# Altium PCB OSP_Carrier_V8_ascii.PcbDoc (part 3 of 3)
Units mm, origin at the board's own origin, x right, y up, seen from the top; angles counter-clockwise.
Board outline 64.1 x 51.1 mm, 4 copper layers (Component Side, Signal Layer 1, Signal Layer 2, Solder Side), stack 1.58 mm thick; 182 components, 144 nets, 1232 pads, 422 vias.
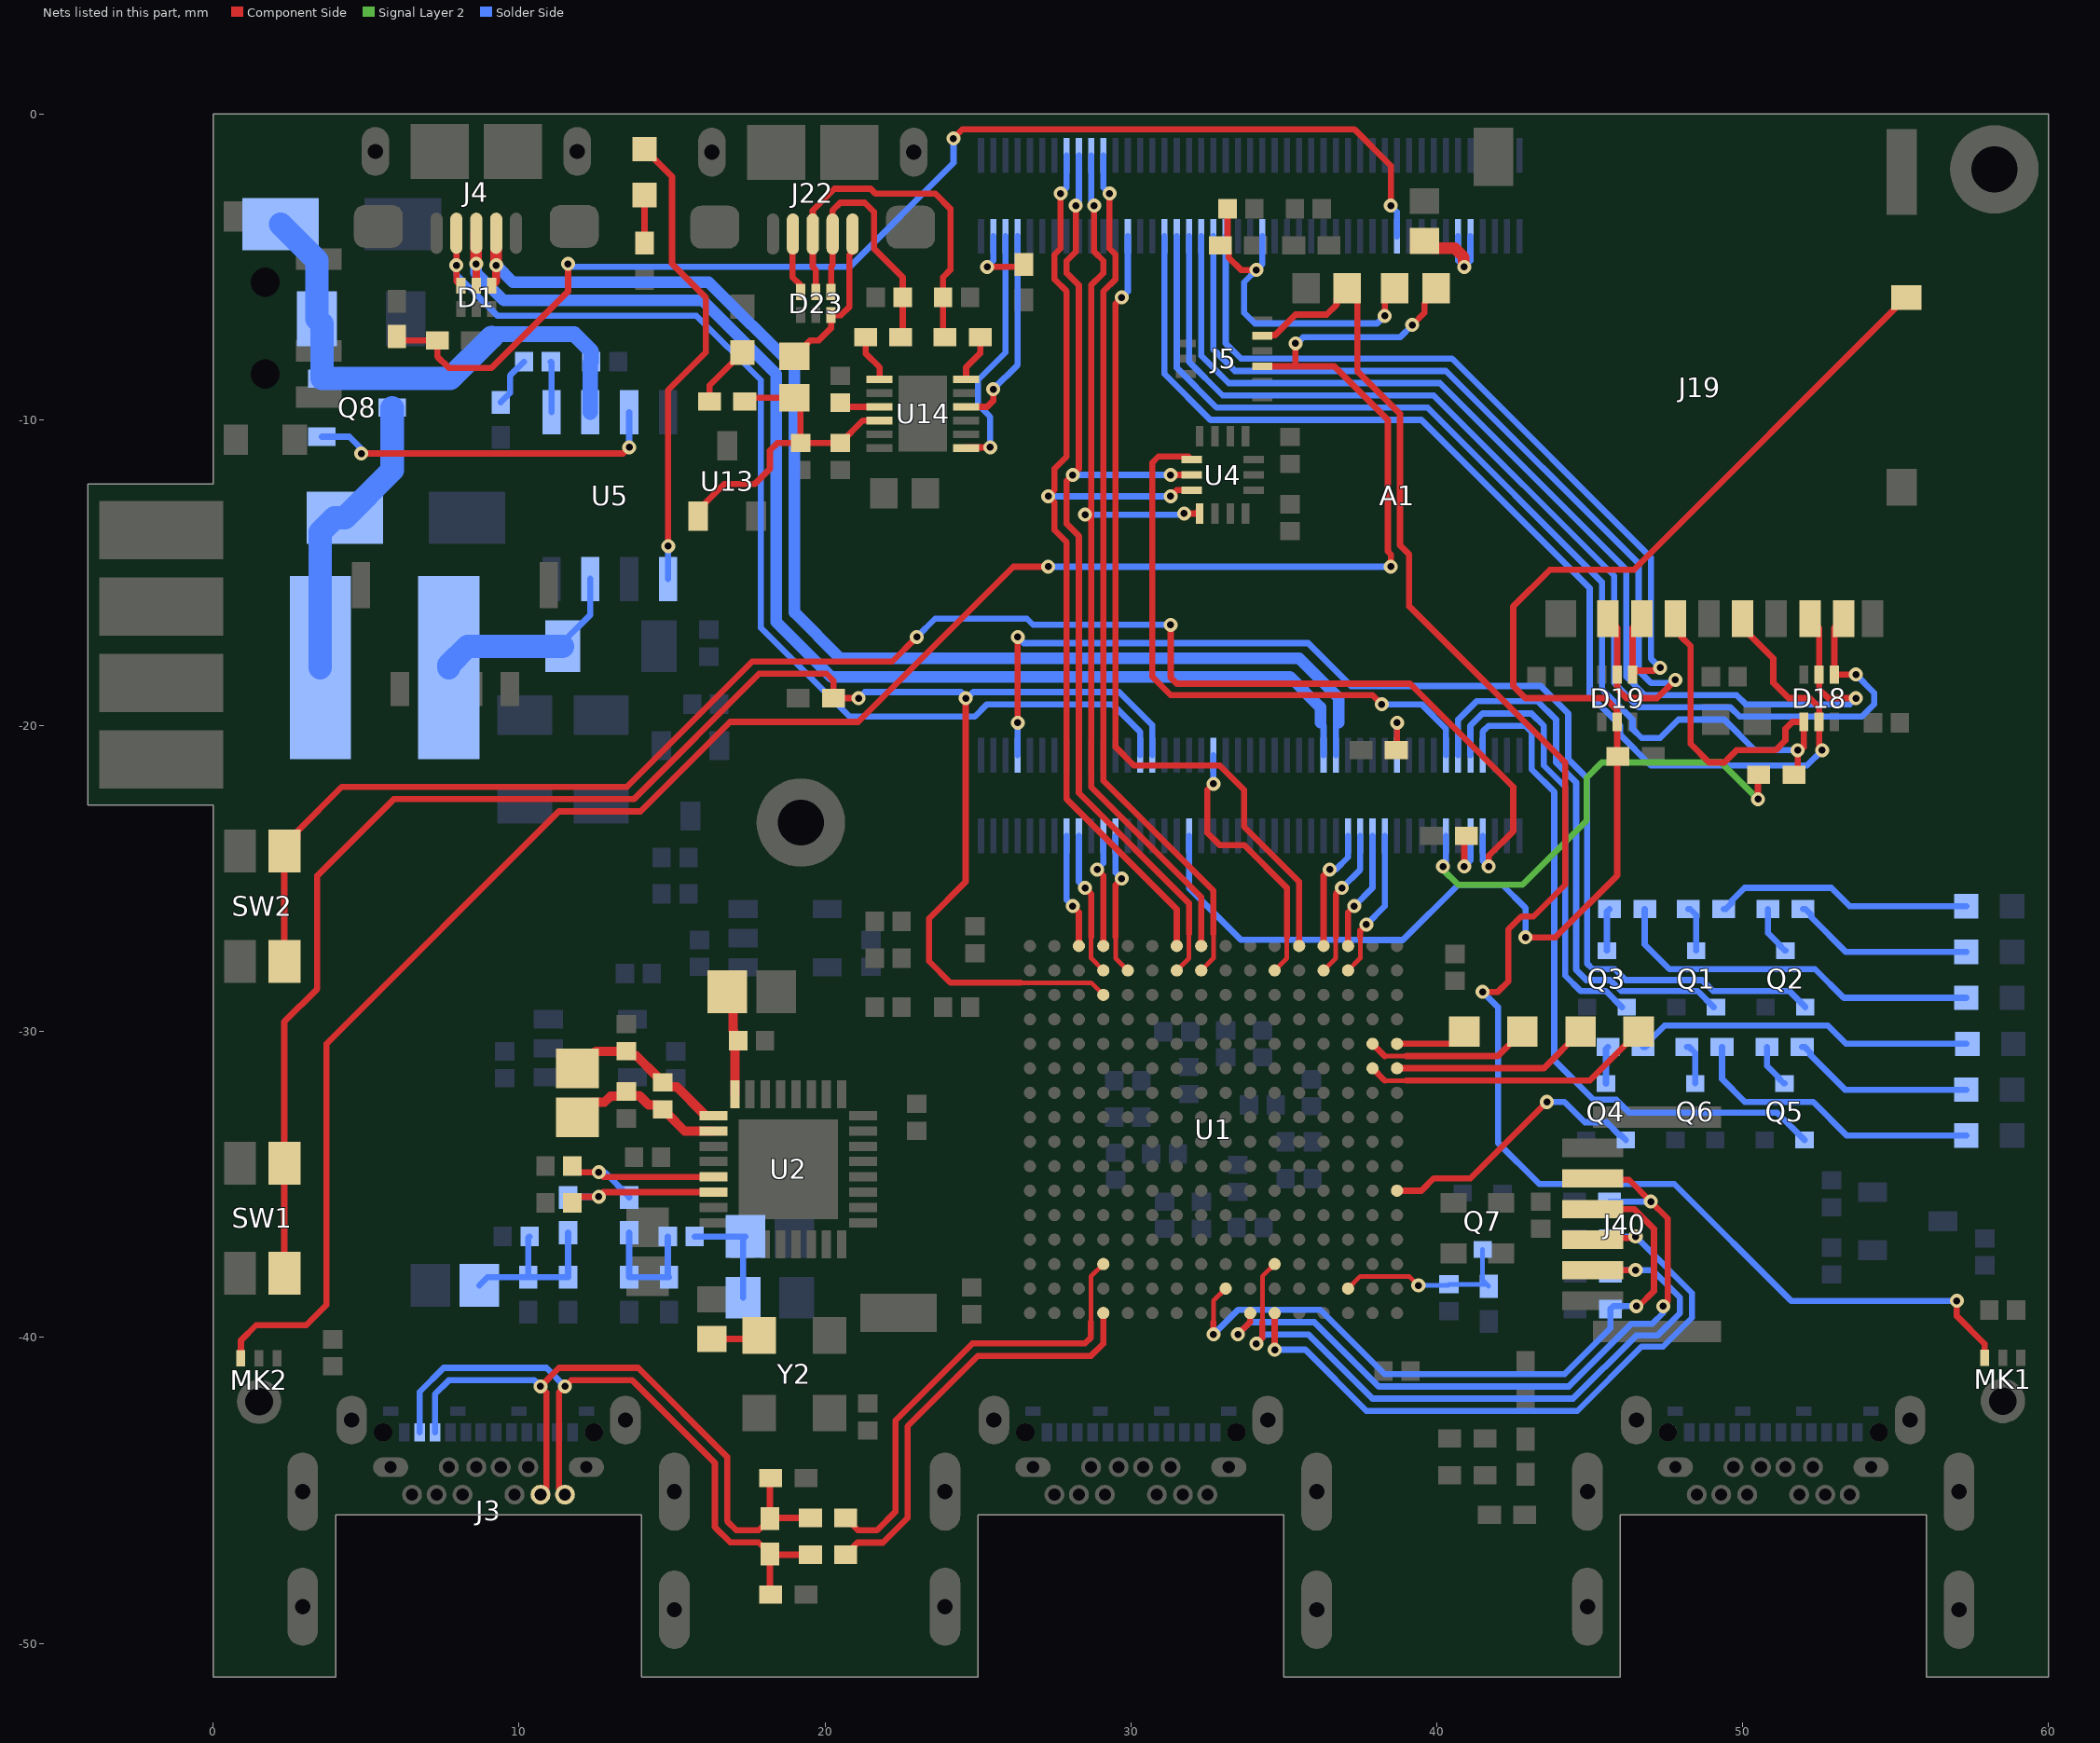
[diagram p4: the nets of this part, all layers, seen from the top]

## Via types
v1: diameter 0.457, hole 0.229, Component Side to Solder Side, tented both sides, 422 vias

## Nets (pads, with @x,y where several pads share a name; then routed paths per layer and width w, separated by ;. In a path a pad name is that pad's centre, name@x,y a point inside that pad or via, vN(x,y) a via of type N, cw(c..) or ccw(c..) an arc to the next point about the centre after c; other vN are vias at no path point) (continued)
MICL_PRE: C98.2 J5.1 MK1.1 | length 55.5
  Component Side w0.203: J5.1@34.3,-7.25 34.323,-7.227 34.713,-7.227 35.38,-6.56 36.4,-6.56 36.727,-6.233 36.727,-6.048 C98.2@37.075,-5.7 ; C98.2@37.4,-5.7 37.4,-8.4 38.8,-9.8 38.8,-14.1 39.1,-14.4 39.1,-16.1 44.2,-21.2 44.2,-25.2 43.165,-26.235 42.765,-26.235 42.34,-26.66 42.34,-28.36 42,-28.7 v1(41.5,-28.7) ; v1(57,-38.8) 57,-39.3 57.912,-40.212 MK1.1@57.912,-40.665
  Solder Side w0.203: v1(41.5,-28.7) 42.001,-29.201 42.001,-33.632 43.35,-34.981 47.763,-34.981 51.584,-38.802 56.998,-38.802 v1(57,-38.8)
MICR: A1.43 C47.2 C99.1 R40.1 | length 11.5
  Component Side w0.203: R40.1@32.925,-4.3 R40.1@32.962,-4.3 ; C47.2@33.16,-3.1 33.16,-4.102 R40.1@32.962,-4.3 ; v1(34.1,-5.1) 33.6,-5.1 33.198,-4.698 33.198,-4.498 33,-4.3 R40.1@32.962,-4.3 ; v1(38.3,-6.6) 38.3,-6.025 C99.1@38.625,-5.7
  Solder Side w0.203: A1.43@34.3,-4 34.3,-4.9 v1(34.1,-5.1) 33.7,-5.5 33.7,-6.5 34.05,-6.85 38.05,-6.85 v1(38.3,-6.6)
MICR_PRE: C99.2 J5.5 MK2.1 | length 69.8
  Component Side w0.203: MK2.1@0.905,-40.685 0.905,-40.095 1.4,-39.6 3.04,-39.6 3.7,-38.94 3.7,-30.4 11.3,-22.8 13.971,-22.8 16.896,-19.875 21.085,-19.875 26.16,-14.8 v1(27.3,-14.8) ; J5.5@34.3,-8.25 35.4,-8.25 ; v1(35.38,-7.5) 35.38,-8.23 35.4,-8.25 ; v1(38.5,-14.8) 38.5,-14.4 38.4,-14.3 38.4,-10 36.65,-8.25 35.4,-8.25 ; v1(39.2,-6.9) 39.6,-6.5 39.6,-6.2 39.627,-6.173 39.627,-6.098 40.025,-5.7 C99.2@40.1,-5.7
  Solder Side w0.203: v1(27.3,-14.8) v1(38.5,-14.8) ; v1(35.38,-7.5) 35.426,-7.5 35.626,-7.3 38.8,-7.3 v1(39.2,-6.9)
MUTE_LED: Q4.1 U1.F1 | length 9.2
  Component Side w0.203: U1.F1@38.7,-35.2 39.5,-35.2 39.9,-34.8 41.1,-34.8 v1(43.6,-32.3)
  Solder Side w0.203: v1(43.6,-32.3) 44.173,-32.3 44.838,-32.965 45.554,-32.965 45.961,-33.373 46.008,-33.373 Q4.1@46.182,-33.546
NetA1_9: A1.9 A1.11 R6.1 | length 4
  Component Side w0.381: R6.1@39.7,-4.1 39.7,-4.2 39.884,-4.385 40.585,-4.385 40.885,-4.685 40.885,-4.985 v1(40.9,-5)
  Solder Side w0.203: A1.11@40.7,-4 40.7,-4.8 v1(40.9,-5) 41.1,-4.8 A1.9@41.1,-4
NetA1_21: A1.21 R30.1 R35.2 | length 40.4
  Component Side w0.203: R35.2@6,-7.275 6.125,-7.4 R30.1@7.325,-7.4 7.325,-7.925 7.7,-8.3 9.1,-8.3 11.6,-5.8 v1(11.6,-4.9) ; v1(24.2,-0.8) 24.5,-0.5 37.3,-0.5 38.5,-1.7 v1(38.5,-3)
  Solder Side w0.203: v1(11.6,-4.9) 11.7,-5 20.8,-5 24.2,-1.6 v1(24.2,-0.8) ; v1(38.5,-3) 38.7,-3.2 A1.21@38.7,-4
NetA1_49: A1.49 D19.4 J19.2 | length 27
  Component Side w0.203: J19.2@46.7,-16.5 46.4,-16.8 D19.4@46.4,-18.325 46.525,-18.2 47.1,-18.2 47.2,-18.1 v1(47.3,-18.1)
  Solder Side w0.203: A1.49@33.1,-4 33.1,-7.5 33.6,-8 40.5,-8 47,-14.5 47,-17.8 v1(47.3,-18.1)
NetA1_51: A1.51 D19.5 J19.1 | length 30.1
  Component Side w0.203: J19.1@45.6,-16.5 45.9,-16.8 D19.5@45.9,-18.325 45.9,-18.8 46.2,-19.1 47.2,-19.1 v1(47.8,-18.5)
  Solder Side w0.203: A1.51@32.7,-4 32.7,-7.7 33.4,-8.4 40.3,-8.4 46.6,-14.7 46.6,-18.2 47,-18.6 47.7,-18.6 v1(47.8,-18.5)
NetA1_53: A1.53 D18.2 J19.7 | length 35.9
  Component Side w0.203: J19.7@52.2,-16.5 52.5,-16.8 D18.2@52.5,-18.325 52.5,-18.8 52.8,-19.1 v1(53.7,-19.1)
  Solder Side w0.203: A1.53@32.3,-4 32.3,-7.9 33.2,-8.8 40.1,-8.8 46.2,-14.9 46.2,-18.4 46.8,-19 49.8,-19 50.1,-19.3 53.5,-19.3 v1(53.7,-19.1)
NetA1_55: A1.55 D18.1 J19.8 | length 37.4
  Component Side w0.203: J19.8@53.3,-16.5 53,-16.8 D18.1@53,-18.325 v1(53.7,-18.325)
  Solder Side w0.203: A1.55@31.9,-4 31.9,-8.1 33,-9.2 39.9,-9.2 45.8,-15.1 45.8,-18.6 46.6,-19.4 49.6,-19.4 49.9,-19.7 53.9,-19.7 54.3,-19.3 54.3,-18.925 v1(53.7,-18.325)
NetA1_57: A1.57 D18.4 J19.3 R32.1 | length 43.4
  Component Side w0.203: J19.3@47.8,-16.5 48,-16.7 48,-17.1 48.3,-17.4 48.3,-20.6 48.9,-21.2 49.4,-21.2 49.8,-20.8 51.075,-20.8 51.4,-20.475 51.4,-20.1 51.625,-19.875 D18.4@52,-19.875 52,-20.7 51.9,-20.8 v1(51.8,-20.8) 51.8,-21.475 R32.1@51.675,-21.6
  Solder Side w0.203: A1.57@31.5,-4 31.5,-8.3 32.8,-9.6 39.7,-9.6 45.4,-15.3 45.4,-18.8 46.4,-19.8 46.4,-20.1 46.7,-20.4 47.3,-20.4 47.9,-19.8 49.4,-19.8 50.4,-20.8 v1(51.8,-20.8)
NetA1_59: A1.59 D18.5 J19.5 | length 39.5
  Component Side w0.203: J19.5@50,-16.5 50.2,-16.7 50.2,-17 51,-17.8 51,-18.6 51.5,-19.1 52.2,-19.1 52.5,-19.4 D18.5@52.5,-19.875 52.5,-20.7 v1(52.6,-20.8)
  Solder Side w0.203: A1.59@31.1,-4 31.1,-8.5 32.6,-10 39.5,-10 45,-15.5 45,-19 46,-20 46,-20.3 47,-21.3 52.1,-21.3 v1(52.6,-20.8)
NetA1_83: A1.83 U14.10 | length 6.7
  Component Side w0.203: U14.10@24.615,-9.575 25.3,-9.575 25.5,-9.375 v1(25.5,-9)
  Solder Side w0.203: v1(25.5,-9) 26.3,-8.2 A1.83@26.3,-4
NetA1_85: A1.85 U14.7 | length 8.3
  Component Side w0.203: U14.7@24.6,-10.94 U14.7@24.615,-10.925 24.64,-10.9 v1(25.4,-10.9)
  Solder Side w0.203: v1(25.4,-10.9) 25.4,-9.9 25,-9.5 25,-8.7 25.9,-7.8 A1.85@25.9,-4
NetA1_87: A1.87 R28.1 | length 2.3
  Component Side w0.203: v1(25.3,-5) 26.425,-5 R28.1@26.5,-4.925
  Solder Side w0.203: v1(25.3,-5) 25.5,-4.8 A1.87@25.5,-4
NetA1_113: A1.113 R32.2 | length 15.4
  Component Side w0.203: v1(50.5,-22.4) 50.5,-21.625 R32.2@50.525,-21.6
  Signal Layer 2 w0.203: v1(40.2,-24.6) 40.2,-24.7 40.7,-25.2 42.8,-25.2 44.9,-23.1 44.9,-21.7 45.4,-21.2 49.3,-21.2 v1(50.5,-22.4)
  Solder Side w0.203: v1(40.2,-24.6) 40.3,-24.5 A1.113@40.3,-23.6
NetA1_122: A1.122 R31.1 | length 2
  Component Side w0.203: R31.1@38.675,-20.8 38.7,-20.775 v1(38.7,-19.9)
  Solder Side w0.203: A1.122@38.7,-20.96 v1(38.7,-19.9)
NetA1_155: A1.155 D19.2 J19.10 R47.1 | length 48
  Component Side w0.203: v1(42.9,-26.919) 43.881,-26.919 45.9,-24.9 D19.2@45.9,-19.875 45.9,-19.5 45.5,-19.1 42.9,-19.1 42.5,-18.7 42.5,-16.1 43.7,-14.9 46.45,-14.9 J19.10@55.35,-6
  Solder Side w0.203: A1.155@31.9,-23.6 31.9,-25.3 33.6,-27 37.482,-27 37.49,-27.008 38.892,-27.008 40.7,-25.2 42.142,-25.2 42.9,-25.958 v1(42.9,-26.919)
NetA1_164: A1.164 D1.3 J4.4 | length 36.5
  Component Side w0.203: J4.4@7.95,-3.9 v1(7.95,-4.95) 7.95,-5.47 D1.3@8.1,-5.62
  Solder Side w0.203: v1(7.95,-4.95) 7.95,-5.25 9.3,-6.6 15.8,-6.6 17.9,-8.7 17.9,-16.8 20.8,-19.7 24.9,-19.7 25.3,-19.3 29.4,-19.3 30.3,-20.2 A1.164@30.3,-20.96
NetC14_1: C14.1 Q7.2 R3.1 U1.B3 | length 6.1
  Component Side w0.152: U1.B3@37.1,-38.4 37.5,-38 39.1,-38 v1(39.4,-38.3)
  Solder Side w0.152: v1(39.4,-38.3) 40.36,-38.3 C14.1@40.4,-38.26 R3.1@41.635,-38.26 ; Q7.2@41.5,-37.125 41.5,-38.125 R3.1@41.635,-38.26 ; R3.1@41.7,-38.325 R3.1@41.635,-38.26
NetC29_1: C29.1 C107.2 R78.2 | length 3.7
  Solder Side w0.203: C29.1@15.74,-36.7 C107.2@17.4,-36.7 17.325,-36.775 R78.2@17.325,-38.7
NetC29_2: C29.2 R33.1 R36.1 R37.2 | length 4.1
  Solder Side w0.203: R36.1@13.6,-36.575 R33.1@13.6,-38.025 R37.2@14.9,-38.025 14.86,-37.985 C29.2@14.86,-36.7
NetC30_2: C30.2 R36.2 U2.29 | length 6.1
  Component Side w0.203: C30.2@11.74,-34.4 11.94,-34.6 v1(12.6,-34.6) 12.75,-34.75 U2.29@16.349,-34.75
  Solder Side w0.203: v1(12.6,-34.6) 12.8,-34.6 13.6,-35.4 R36.2@13.6,-35.425
NetC31_2: C31.2 C32.1 U2.24 | length 4
  Component Side w0.203: C32.1@17.05,-30.41 C32.1@17.16,-30.3
  Component Side w0.305: C31.2@16.5,-29 C31.2@16.8,-28.7 17,-28.9 17,-29.954 17.012,-29.966 17.012,-30.152 C32.1@17.16,-30.3 ; U2.24@17.05,-32.049 C32.1@17.05,-30.41
NetC33_1: C33.1 C34.2 C35.1 U2.25 | length 5.6
  Component Side w0.305: C34.2@11.9,-31.2 11.95,-31.2 12.51,-30.64 C33.1@13.5,-30.64 13.648,-30.788 13.828,-30.788 14.532,-31.492 14.532,-31.512 14.68,-31.66 C35.1@14.7,-31.66 14.848,-31.808 15.159,-31.808 16.044,-32.693 16.044,-32.75 U2.25@16.349,-32.75
NetC34_1: C34.1 C35.2 C36.1 U2.26 | length 5.3
  Component Side w0.305: C34.1@11.9,-32.8 12.393,-32.307 12.793,-32.307 12.992,-32.108 13.352,-32.108 C36.1@13.5,-31.96 13.64,-32.1 13.94,-32.1 14.232,-32.392 14.552,-32.392 C35.2@14.7,-32.54 14.72,-32.54 14.868,-32.688 14.868,-32.708 15.41,-33.25 U2.26@16.349,-33.25
NetC37_2: C37.2 C38.1 R38.1 R39.1 R42.2 | length 5.8
  Solder Side w0.203: C37.2@8.7,-38.3 8.975,-38.025 R42.2@10.3,-38.025 ; C38.1@10.34,-36.7 10.3,-36.74 R42.2@10.3,-38.025 ; R39.1@11.6,-36.575 R38.1@11.6,-38.025 R42.2@10.3,-38.025
NetC40_2: C40.2 R39.2 U2.30 | length 5.8
  Component Side w0.203: C40.2@11.74,-35.6 11.94,-35.4 v1(12.6,-35.4) 12.75,-35.25 U2.30@16.349,-35.25
  Solder Side w0.203: R39.2@11.6,-35.425 11.625,-35.4 v1(12.6,-35.4)
NetC46_1: C46.1 C53.1 D2.2 Q8.2 U5.2 | length 17.3
  Solder Side w0.508: 9.1,-7.3 9.2,-7.2 11.8,-7.2 12.36,-7.76 C53.1@12.36,-8.1 12.33,-8.13 U5.2@12.33,-9.75
  Solder Side w0.762: D2.2@2.2,-3.6 3.39,-4.79 C46.1@3.39,-6.7 3.55,-6.86 Q8.2@3.55,-8.65 7.75,-8.65 9.1,-7.3
NetC49_1: C49.1 U5.1 | length 1.7
  Solder Side w0.203: C49.1@11.04,-8.1 11.06,-8.12 U5.1@11.06,-9.75
NetC49_2: C49.2 R9.1 | length 1.6
  Solder Side w0.203: R9.1@9.4,-9.425 9.7,-9.125 9.7,-8.56 C49.2@10.16,-8.1
NetC71_2: C71.2 C72.2 FB3.1 R49.1 U13.1 U14.4 | length 10.9
  Component Side w0.203: U13.1@15.85,-13.15 15.85,-12.95 16.7,-12.1 17.7,-12.1 18.2,-11.6 18.2,-11 18.44,-10.76 C71.2@19.2,-10.76 ; R49.1@17.375,-9.4 17.5,-9.275 FB3.1@19,-9.275 19.2,-9.475 C71.2@19.2,-10.76 ; U14.4@21.785,-10.025 21.235,-10.025 C72.2@20.5,-10.76 C71.2@19.2,-10.76
NetC73_2: C73.2 U14.3 | length 1.3
  Component Side w0.203: C73.2@20.5,-9.44 20.635,-9.575 U14.3@21.785,-9.575
NetD3_2: D3.2 L1.2 Q8.3 | length 9.7
  Solder Side w0.762: L1.2@3.5,-18.1 3.5,-13.669 3.969,-13.2 D3.2@4.3,-13.2 5.85,-11.65 Q8.3@5.85,-9.6
NetD23_3: D23.3 J22.4 | length 2.1
  Component Side w0.203: J22.4@18.95,-3.925 18.934,-3.941 18.934,-5.334 19.2,-5.6 D23.3@19.2,-5.82 D23.3@19.2,-5.92
NetD23_6: D23.6 FB3.2 J22.1 | length 5.2
  Component Side w0.203: FB3.2@19,-7.925 19.525,-7.4 19.8,-7.4 20.2,-7 D23.6@20.2,-6.58 20.52,-6.58 20.8,-6.3 20.8,-4.6 20.9,-4.5 J22.1@20.9,-3.925 J22.1@20.966,-3.991
NetJ40_2: J40.2 R4.1 U1.C6 | length 23.4
  Component Side w0.152: 34.3,-39.5 34.3,-38 U1.C6@34.7,-37.6
  Component Side w0.203: v1(34.1,-40.2) 34.3,-40 34.3,-39.5 ; J40.2@45.1,-37.8 45.102,-37.798 v1(46.5,-37.798)
  Solder Side w0.203: v1(34.1,-40.2) 34.4,-39.9 35.8,-39.9 37.9,-42 44.455,-42 46.518,-39.938 47.214,-39.938 47.95,-39.202 47.95,-38.7 47.047,-37.798 v1(46.5,-37.798) 45.777,-37.798 R4.1@45.675,-37.9
NetJ40_3: J40.3 R7.1 U1.A6 | length 22.6
  Component Side w0.203: v1(34.7,-40.4) U1.A6@34.7,-39.2 ; J40.3@45.1,-36.8 45.151,-36.749 46.451,-36.749 v1(46.5,-36.7)
  Solder Side w0.203: v1(34.7,-40.4) 35.7,-40.4 37.7,-42.4 44.594,-42.4 46.694,-40.3 47.4,-40.3 48.345,-39.355 48.345,-38.545 v1(46.5,-36.7) 45.735,-36.7 R7.1@45.675,-36.76
NetJ40_4: J40.4 R10.1 U1.B8 | length 23.1
  Component Side w0.152: 32.7,-39.5 32.7,-38.8 U1.B8@33.1,-38.4
  Component Side w0.203: v1(32.7,-39.9) 32.7,-39.5 ; J40.4@45.1,-35.8 46.451,-35.8 47.1,-36.449 47.1,-38.482 46.607,-38.975 v1(46.525,-38.975)
  Solder Side w0.203: v1(32.7,-39.9) 33.5,-39.1 36.2,-39.1 38.3,-41.2 44.178,-41.2 45.675,-39.703 R10.1@45.675,-39.075 45.775,-38.975 v1(46.525,-38.975)
NetJ40_5: J40.5 R11.2 U1.A7 | length 24.5
  Component Side w0.203: v1(33.5,-39.9) 33.9,-39.5 U1.A7@33.9,-39.2 ; J40.5@45.1,-34.8 45.146,-34.846 46.286,-34.846 v1(47,-35.56) 47.55,-36.11 47.55,-38.825 v1(47.4,-38.975)
  Solder Side w0.203: v1(33.5,-39.9) 33.9,-39.5 36,-39.5 38.1,-41.6 44.317,-41.6 46.367,-39.55 47.05,-39.55 47.4,-39.2 v1(47.4,-38.975) ; R11.2@45.774,-35.684 R11.2@45.65,-35.56 v1(47,-35.56)
NetL1_1: L1.1 R8.2 U5.7 | length 6.6
  Solder Side w0.203: R8.2@11.425,-17.4 11.425,-17.275 12.33,-16.37 U5.7@12.33,-15.2
  Solder Side w0.762: L1.1@7.7,-18.1 7.7,-18.019 8.319,-17.4 R8.2@11.425,-17.4
NetLD1_1: LD1.1 R1.1 | length 1.6
  Component Side w0.203: R1.1@14.1,-4.25 R1.1@14.1,-4.225 LD1.1@14.1,-2.65
NetLD1_2: LD1.2 U5.5 | length 15.4
  Component Side w0.203: LD1.2@14.1,-1.15 15,-2.05 15,-4.9 16.1,-6 16.1,-7.8 14.87,-9.03 v1(14.87,-14.13)
  Solder Side w0.203: U5.5@14.87,-15.2 v1(14.87,-14.13)
NetLD5_2: LD5.2 R22.2 | length 8.5
  Solder Side w0.203: R22.2@49.375,-25.992 49.45,-25.992 49.648,-25.794 49.648,-25.719 50.067,-25.3 52.9,-25.3 53.5,-25.9 LD5.2@57.31,-25.9
NetLD6_2: LD6.2 R23.2 | length 6
  Solder Side w0.203: R23.2@51.975,-25.992 52.05,-25.992 52.248,-26.19 52.248,-26.265 53.38,-27.397 LD6.2@57.31,-27.397
NetLD7_2: LD7.2 R24.2 | length 12.4
  Solder Side w0.203: R24.2@46.799,-25.992 46.799,-27.149 47.609,-27.959 52.368,-27.959 53.306,-28.897 LD7.2@57.31,-28.897
NetLD8_2: LD8.2 R25.2 | length 11.1
  Solder Side w0.203: R25.2@46.75,-30.5 46.825,-30.5 47.023,-30.302 47.023,-30.227 47.45,-29.8 52.783,-29.8 53.38,-30.397 LD8.2@57.31,-30.397
NetLD9_2: LD9.2 R26.2 | length 6
  Solder Side w0.203: R26.2@51.946,-30.5 52.021,-30.5 52.219,-30.698 52.219,-30.773 53.346,-31.9 LD9.2@57.31,-31.9
NetLD10_2: LD10.2 R27.2 | length 9.8
  Solder Side w0.203: R27.2@49.325,-30.5 49.325,-31.55 50.075,-32.3 52.309,-32.3 53.409,-33.4 LD10.2@57.31,-33.4
NetLD11_1: LD11.1 R49.2 | length 2
  Component Side w0.203: R49.2@16.225,-9.4 16.225,-8.875 LD11.1@17.3,-7.8
NetQ1_2: Q1.2 R22.1 | length 1.5
  Solder Side w0.203: R22.1@48.225,-25.992 48.282,-25.992 48.48,-26.19 Q1.2@48.48,-27.35
NetQ2_2: Q2.2 R23.1 | length 1.6
  Solder Side w0.203: R23.1@50.825,-25.992 50.825,-26.775 51.202,-27.151 51.202,-27.176 51.375,-27.35 Q2.2@51.4,-27.35
NetQ3_2: Q3.2 R24.1 | length 1.4
  Solder Side w0.203: Q3.2@45.561,-27.35 45.561,-26.08 R24.1@45.649,-25.992
NetQ4_2: Q4.2 R25.1 | length 1.2
  Solder Side w0.203: Q4.2@45.532,-31.696 45.532,-30.568 R25.1@45.6,-30.5
NetQ5_2: Q5.2 R26.1 | length 1.4
  Solder Side w0.203: R26.1@50.796,-30.5 50.796,-31.117 51.172,-31.494 51.172,-31.519 51.346,-31.692 Q5.2@51.371,-31.692
NetQ6_2: Q6.2 R27.1 | length 1.4
  Solder Side w0.203: R27.1@48.175,-30.5 48.25,-30.5 48.448,-30.698 48.448,-30.815 48.451,-30.817 Q6.2@48.451,-31.692
NetQ8_1: Q8.1 U5.3 | length 11.6
  Component Side w0.203: v1(4.84,-11.1) 13.4,-11.1 v1(13.6,-10.9)
  Solder Side w0.203: Q8.1@3.55,-10.55 4.45,-10.55 4.84,-10.94 v1(4.84,-11.1) ; v1(13.6,-10.9) U5.3@13.6,-9.75
NetR15_2: R15.2 Y2.3 | length 1.6
  Component Side w0.203: R15.2@16.3,-40.05 17.73,-40.05 Y2.3@17.85,-39.93
R_LVDS_N: J3.A10 J3.B10 R18.1 R19.2 R20.2 | length 22.7
  Component Side w0.203: J3.B10@10.7,-45.14 10.894,-44.946 10.894,-41.794 v1(10.7,-41.6) 11.306,-40.994 13.894,-40.994 16.8,-43.9 16.8,-46 17.1,-46.3 17.825,-46.3 R20.2@18.2,-45.925 ; R18.1@18.225,-44.6 18.2,-44.625 R20.2@18.2,-45.925 ; R19.2@19.525,-45.9 18.225,-45.9 R20.2@18.2,-45.925
  Solder Side w0.203: J3.A10@7.25,-43.1 7.25,-41.85 7.7,-41.4 10.5,-41.4 v1(10.7,-41.6)
R_LVDS_P: J3.A11 J3.B11 R20.1 R21.2 R29.2 | length 23.4
  Component Side w0.203: J3.B11@11.5,-45.14 11.3,-44.94 11.3,-41.8 v1(11.5,-41.6) 11.7,-41.4 13.7,-41.4 16.4,-44.1 16.4,-46.2 16.9,-46.7 17.825,-46.7 R20.1@18.2,-47.075 ; R29.2@18.225,-48.4 18.2,-48.375 R20.1@18.2,-47.075 ; R21.2@19.525,-47.1 18.225,-47.1 R20.1@18.2,-47.075
  Solder Side w0.203: J3.A11@6.75,-43.1 6.75,-41.775 7.532,-40.994 10.894,-40.994 v1(11.5,-41.6)
R_PRE_N: R19.1 U1.C13 | length 15.1
  Component Side w0.152: 28.694,-39.5 28.694,-38.006 U1.C13@29.1,-37.6
  Component Side w0.203: R19.1@20.675,-45.9 21.075,-46.3 21.7,-46.3 22.3,-45.7 22.3,-42.72 24.826,-40.194 28.5,-40.194 28.694,-40 28.694,-39.5
R_PRE_P: R21.1 U1.A13 | length 14
  Component Side w0.203: R21.1@20.675,-47.1 21.069,-46.706 21.894,-46.706 22.7,-45.9 22.7,-42.9 25,-40.6 28.7,-40.6 29.1,-40.2 U1.A13@29.1,-39.2
SPI1_CLK: A1.125 U1.T3 | length 3.9
  Component Side w0.203: U1.T3@37.1,-27.2 37.1,-26.1 v1(37.3,-25.9)
  Solder Side w0.203: v1(37.3,-25.9) 37.9,-25.3 A1.125@37.9,-23.6
SPI1_CS0: A1.129 U1.T4 | length 4
  Component Side w0.203: U1.T4@36.3,-27.2 36.3,-24.9 v1(36.5,-24.7)
  Solder Side w0.203: v1(36.5,-24.7) 36.7,-24.7 37.1,-24.3 A1.129@37.1,-23.6
SPI1_CS2: A1.65 U1.T5 | length 27.5
  Component Side w0.203: v1(29.7,-6) 29.5,-6.2 29.5,-20.7 30.1,-21.3 32.9,-21.3 33.7,-22.1 33.7,-23.3 35.5,-25.1 U1.T5@35.5,-27.2
  Solder Side w0.203: v1(29.7,-6) 29.9,-5.8 A1.65@29.9,-4
SPI1_MISO: A1.127 U1.R4 | length 4.9
  Component Side w0.152: U1.R4@36.3,-28 36.7,-27.6 36.7,-26.9
  Component Side w0.203: 36.7,-26.9 36.7,-25.5 v1(36.9,-25.3)
  Solder Side w0.203: v1(36.9,-25.3) 37.5,-24.7 A1.127@37.5,-23.6
SPI1_MOSI: A1.123 U1.R3 | length 4.9
  Component Side w0.152: U1.R3@37.1,-28 37.5,-27.6 37.5,-26.9
  Component Side w0.203: 37.5,-26.9 37.5,-26.7 v1(37.7,-26.5)
  Solder Side w0.203: v1(37.7,-26.5) 38.3,-25.9 A1.123@38.3,-23.6
SPI3_CLK: A1.74 U1.R10 U4.13 | length 32.8
  Component Side w0.152: U1.R10@31.5,-28 31.9,-27.6 31.9,-26.8
  Component Side w0.203: v1(28.2,-3) 28.2,-4.5 27.9,-4.8 27.9,-5.2 28.3,-5.6 28.3,-11.6 v1(28.1,-11.8) 27.9,-12 27.9,-13.4 28.3,-13.8 28.3,-22.2 31.9,-25.8 31.9,-26.8 ; v1(31.3,-11.8) U4.13@31.988,-11.8
  Solder Side w0.203: v1(28.1,-11.8) v1(31.3,-11.8) ; v1(28.2,-3) 28.3,-2.9 A1.74@28.3,-1.36
SPI3_CS0: A1.70 U1.R9 | length 28.6
  Component Side w0.152: U1.R9@32.3,-28 32.7,-27.6 32.7,-26.8
  Component Side w0.203: v1(29.3,-2.6) 29.3,-4.4 29.5,-4.6 29.5,-5.4 29.1,-5.8 29.1,-21.8 32.7,-25.4 32.7,-26.8
  Solder Side w0.203: A1.70@29.1,-1.36 29.1,-2.4 v1(29.3,-2.6)
SPI3_CS1: A1.114 U4.12 | length 19.7
  Component Side w0.203: 30.7,-11.44 30.7,-18.4 31.3,-19 37.9,-19 v1(38.2,-19.3) ; 30.7,-11.4 30.9,-11.2 31.888,-11.2 U4.12@31.988,-11.3 U4.12@31.8,-11.3
  Solder Side w0.203: v1(38.2,-19.3) 39.5,-19.3 40.3,-20.1 A1.114@40.3,-20.96
SPI3_CS3: A1.152 U1.R6 | length 8.8
  Component Side w0.152: U1.R6@34.7,-28 35.1,-27.6 35.1,-26.9
  Component Side w0.203: v1(32.7,-21.9) 32.5,-22.1 32.5,-23.5 32.9,-23.9 33.7,-23.9 35.1,-25.3 35.1,-26.9
  Solder Side w0.203: v1(32.7,-21.9) A1.152@32.7,-20.96
SPI3_MISO: A1.72 U1.T9 U4.1 | length 32.1
  Component Side w0.203: v1(28.8,-3) 28.8,-4.5 29.1,-4.8 29.1,-5.2 28.7,-5.6 28.7,-12.9 ; v1(31.738,-13.062) U4.1@32.25,-13.062 U4.1@32.188,-13 ; U1.T9@32.3,-27.2 32.3,-25.6 28.7,-22 28.7,-13.3 ; 28.7,-13.3 28.7,-12.9 ; 28.7,-13.3 v1(28.5,-13.1) 28.7,-12.9
  Solder Side w0.203: v1(28.5,-13.1) 31.7,-13.1 v1(31.738,-13.062) ; A1.72@28.7,-1.36 28.7,-2.9 v1(28.8,-3)
SPI3_MOSI: A1.76 U1.T10 U4.14 | length 32.9
  Component Side w0.203: v1(27.7,-2.6) 27.7,-4.4 27.5,-4.6 27.5,-5.4 27.9,-5.8 27.9,-11.2 27.5,-11.6 27.5,-12.3 v1(27.3,-12.5) 27.5,-12.7 27.5,-13.6 27.9,-14 27.9,-22.4 31.5,-26 U1.T10@31.5,-27.2 ; v1(31.3,-12.5) 31.5,-12.3 U4.14@31.988,-12.3
  Solder Side w0.203: v1(27.3,-12.5) v1(31.3,-12.5) ; v1(27.7,-2.6) 27.9,-2.4 A1.76@27.9,-1.36
SPI4_CLK: A1.167 U1.R12 | length 4.7
  Component Side w0.152: 29.5,-26.9 29.5,-27.6 U1.R12@29.9,-28
  Component Side w0.203: 29.5,-26.9 29.5,-25.2 v1(29.7,-25)
  Solder Side w0.203: A1.167@29.5,-23.6 29.5,-24.8 v1(29.7,-25)
SPI4_CS: A1.169 U1.T13 | length 3.8
  Component Side w0.203: v1(28.9,-24.7) 29.1,-24.9 U1.T13@29.1,-27.2
  Solder Side w0.203: v1(28.9,-24.7) 29.1,-24.5 A1.169@29.1,-23.6
SPI4_MISO: A1.175 U1.T14 | length 3.8
  Component Side w0.203: v1(28.1,-25.9) 28.3,-26.1 U1.T14@28.3,-27.2
  Solder Side w0.203: A1.175@27.9,-23.6 27.9,-25.7 v1(28.1,-25.9)
SPI4_MOSI: A1.173 U1.R13 | length 4.7
  Component Side w0.152: 28.7,-26.9 28.7,-27.6 U1.R13@29.1,-28
  Component Side w0.203: v1(28.5,-25.3) 28.7,-25.5 28.7,-26.9
  Solder Side w0.203: A1.173@28.3,-23.6 28.3,-25.1 v1(28.5,-25.3)
SW_PWR: A1.109 R34.2 | length 2.1
  Component Side w0.203: v1(40.9,-24.6) 40.9,-23.675 R34.2@40.975,-23.6
  Solder Side w0.203: v1(40.9,-24.6) 41.1,-24.4 A1.109@41.1,-23.6
SW_VOL+: A1.162 R44.1 SW1.1 U1.P13 | length 61.1
  Component Side w0.152: 26.4,-28.4 28.7,-28.4 U1.P13@29.1,-28.8
  Component Side w0.203: SW1.1@2.325,-37.9 SW1.1@2.325,-34.3 2.325,-29.675 3.4,-28.6 3.4,-24.9 5.9,-22.4 13.75,-22.4 17.85,-18.3 20.05,-18.3 20.275,-18.525 R44.1@20.275,-19.1 v1(21.1,-19.1) ; v1(24.6,-19.1) 24.6,-25.1 23.4,-26.3 23.4,-27.7 24.1,-28.4 26.4,-28.4
  Solder Side w0.203: v1(21.1,-19.1) 21.3,-18.9 24.446,-18.9 24.646,-19.1 24.846,-18.9 29.62,-18.9 30.7,-19.98 A1.162@30.7,-20.96
SW_VOL-: A1.107 SW2.1 | length 54.4
  Component Side w0.203: SW2.1@2.325,-27.7 SW2.1@2.325,-24.1 2.748,-23.677 2.748,-23.452 4.2,-22 13.52,-22 17.62,-17.9 22.2,-17.9 v1(23,-17.1) ; v1(31.3,-16.7) 31.3,-18.425 31.5,-18.625 39.125,-18.625 42.5,-22 42.5,-23.45 41.7,-24.25 v1(41.7,-24.6)
  Solder Side w0.203: v1(23,-17.1) 23.6,-16.5 26.6,-16.5 26.8,-16.7 v1(31.3,-16.7) ; A1.107@41.5,-23.6 41.5,-24.4 v1(41.7,-24.6)
TP_L1: TP1.1 U1.L1 | length 6.5
  Component Side w0.203: U1.L1@38.7,-31.2 38.704,-31.196 43.504,-31.196 TP1.1@44.7,-30
TP_L2: TP2.1 U1.L2 | length 9.5
  Component Side w0.152: 38.3,-31.6 39,-31.6
  Component Side w0.203: U1.L2@37.9,-31.2 38.3,-31.6 ; 39,-31.6 45,-31.6 TP2.1@46.6,-30
TP_M1: TP3.1 U1.M1 | length 2.4
  Component Side w0.203: U1.M1@38.7,-30.4 40.5,-30.4 TP3.1@40.9,-30
TP_M2: TP4.1 U1.M2 | length 5.4
  Component Side w0.152: 38.3,-30.8 39,-30.8
  Component Side w0.203: U1.M2@37.9,-30.4 38.3,-30.8 ; 39,-30.8 42,-30.8 TP4.1@42.8,-30
USB_D_N: A1.132 D1.1 J4.2 | length 41.8
  Component Side w0.254: D1.1@9.1,-5.62 9.25,-5.47 v1(9.25,-4.95)
  Component Side w0.381: v1(9.25,-4.95) J4.2@9.25,-3.9
  Solder Side w0.203: A1.132@36.7,-20.96 36.7,-20 36.8,-19.9
  Solder Side w0.381: v1(9.25,-4.95) 9.8,-5.5 16.2,-5.5 19,-8.3 19,-16.3 20.5,-17.8 35.5,-17.8 36.8,-19.1 36.8,-19.9
USB_D_P: A1.134 D1.2 J4.3 | length 41.8
  Component Side w0.254: D1.2@8.6,-5.62 v1(8.6,-4.9)
  Component Side w0.381: v1(8.6,-4.9) J4.3@8.6,-3.9
  Solder Side w0.203: 36.2,-19.9 36.3,-20 A1.134@36.3,-20.96
  Solder Side w0.381: v1(8.6,-4.9) 8.6,-5.2 9.5,-6.1 16,-6.1 18.4,-8.5 18.4,-16.6 20.2,-18.4 35.2,-18.4 36.2,-19.4 36.2,-19.9
USB_U_N: C74.2 D23.1 J22.2 R54.2 | length 8.9
  Component Side w0.203: D23.1@20.2,-5.92 D23.1@20.2,-5.82 20.2,-5 20.25,-4.95 J22.2@20.25,-3.925 20.25,-3.15 20.5,-2.9 21.3,-2.9 21.6,-3.2 21.6,-4.4 21.734,-4.534 ; 21.735,-4.534 22.066,-4.865 22.54,-5.34 C74.2@22.54,-6 22.54,-7.235 R54.2@22.475,-7.3
USB_U_P: C75.2 D23.2 J22.3 R55.2 | length 12.2
  Component Side w0.203: D23.2@19.7,-5.92 D23.2@19.7,-5.82 19.7,-5.1 19.6,-5 J22.3@19.6,-3.925 19.6,-3.153 20.311,-2.443 21.489,-2.443 21.647,-2.6 23.6,-2.6 24.1,-3.1 24.1,-5.1 23.86,-5.34 C75.2@23.86,-6 23.86,-7.235 R55.2@23.925,-7.3
USB_UX_N: R54.1 U14.1 | length 1.6
  Component Side w0.203: R54.1@21.325,-7.3 21.325,-7.825 21.785,-8.285 U14.1@21.785,-8.675
USB_UX_P: R55.1 U14.12 | length 1.6
  Component Side w0.203: U14.12@24.615,-8.675 24.615,-8.285 25.075,-7.825 R55.1@25.075,-7.3
USR_LED_1_CTRL: A1.112 Q1.1 | length 18.3
  Solder Side w0.203: A1.112@40.7,-20.96 40.7,-19.8 41.3,-19.2 43.3,-19.2 43.9,-19.8 43.9,-21.2 44.556,-21.856 44.556,-27.983 44.888,-28.315 45.672,-28.315 46.027,-28.671 48.524,-28.671 Q1.1@49.053,-29.2
USR_LED_2_CTRL: A1.184 Q2.1 | length 39.1
  Component Side w0.203: v1(26.3,-19.9) v1(26.3,-17.1)
  Solder Side w0.203: A1.184@26.3,-20.96 v1(26.3,-19.9) ; v1(26.3,-17.1) 26.5,-17.3 35.8,-17.3 37.2,-18.7 43.4,-18.7 44.3,-19.6 44.3,-21.092 44.911,-21.703 44.911,-27.771 45.1,-27.959 45.819,-27.959 46.175,-28.315 48.672,-28.315 49.027,-28.671 51.521,-28.671 Q2.1@52.05,-29.2
USR_LED_3_CTRL: A1.110 Q3.1 | length 14.4
  Solder Side w0.203: A1.110@41.1,-20.96 41.1,-20 41.5,-19.6 43.1,-19.6 43.5,-20 43.5,-21.3 44.2,-22 44.2,-28.172 44.699,-28.671 45.524,-28.671 Q3.1@46.053,-29.2
WAN_LED_CTRL: A1.108 Q5.1 | length 22.8
  Solder Side w0.203: A1.108@41.5,-20.96 41.5,-20.2 41.7,-20 42.9,-20 43.1,-20.2 43.1,-21.422 43.843,-22.165 43.843,-30.942 45.126,-32.225 45.866,-32.225 46.294,-32.653 51.131,-32.653 Q5.1@52.021,-33.542
pads on no net: A1.0 A1.12 A1.13 A1.14 A1.15 A1.16 A1.17 A1.18 A1.19 A1.20 A1.22 A1.23 A1.24 A1.25 A1.26 A1.28 A1.29 A1.30 A1.33 A1.34 A1.35 A1.36 A1.38 A1.40 A1.42 A1.44 A1.48 A1.50 A1.52 A1.54 A1.56 A1.58 A1.60 A1.62 A1.63 A1.64 A1.66 A1.67 A1.73 A1.75 A1.77 A1.80 A1.82 A1.84 A1.88 A1.89 A1.90 A1.104 A1.106 A1.116 A1.118 A1.119 A1.120 A1.124 A1.126 A1.128 A1.133 A1.135 A1.138 A1.139 A1.140 A1.141 A1.144 A1.145 A1.146 A1.148 A1.150 A1.153 A1.154 A1.157 A1.158 A1.168 A1.170 A1.171 A1.172 A1.174 A1.176 A1.178 A1.180 A1.181 A1.183 A1.186 A1.187 A1.188 D1.5 D19.1 D23.5 J0.1 J00.1 J00.2 J0.2 J0.3 J00.3 J00.4 J0.4 J0.5 J00.5 J0.6 J00.6 J0.7 J00.7 J0.8 J00.8 J0.9 J00.9 J0.10 J00.10 J00.11 J0.11 J00.12 J0.12 J0.13 J00.13 J00.14 J0.14 J00.15 J0.15 J00.16 J0.16 J00.17 J0.17 J00.18 J0.18 J0.19 J00.19 J0.20 J00.20 J00.21 J0.21 J0.22 J00.22 J0.23 J00.23 J00.24 J0.24 J00.25 J0.25 J0.26 J00.26 J00.27 J0.27 J00.28 J0.28 J0.29 J00.29 J0.30 J00.30 J0.31 J00.31 J00.32 J0.32 J00.33 J0.33 J00.34 J0.34 J00.35 J0.35 J00.36 J0.36 J0.37 J00.37 J0.38 J00.38 J0.39 J00.39 J00.40 J0.40 J0.41 J00.41 J0.42 J00.42 J0.43 J00.43 J0.44 J00.44 J0.45 J00.45 J0.46 J00.46 J0.47 J00.47 J00.48 J0.48 J00.49 J0.49 J0.50 J00.50 J00.51 J0.51 J0.52 J00.52 J0.53 J00.53 J00.54 J0.54 J0.55 J00.55 J0.56 J00.56 J0.57 J00.57 J0.58 J00.58 J00.59 J0.59 J0.60 J00.60 J00.61 J0.61 J00.62 J0.62 J00.63 J0.63 J00.64 J0.64 J0.65 J00.65 J00.66 J0.66 J0.67 J00.67 J0.68 J00.68 J0.69 J00.69 J0.70 J00.70 J0.71 J00.71 J0.72 J00.72 J0.73 J00.73 J00.74 J0.74 J0.75 J00.75 J0.76 J00.76 J0.77 J00.77 J00.78 J0.78 J0.79 J00.79 J0.80 J00.80 J00.81 J0.81 J0.82 J00.82 J00.83 J0.83 J0.84 J00.84 J00.85 J0.85 J00.86 J0.86 J0.87 J00.87 J0.88 J00.88 J00.89 J0.89 J00.90 J0.90 J1.A2 J1.A4 J1.A5 J1.A6 J1.A7 J1.A8 J1.A10 J1.A11 J1.B2 J1.B4 J1.B5 J1.B6 J1.B7 J1.B8 J1.B10 J1.B11 J1.M J2.A2 J2.A3 J2.A5 J2.A6 J2.A7 J2.A8 J2.A9 J2.B2 J2.B3 J2.B5 J2.B6 J2.B7 J2.B8 J2.B9 J2.M J3.A2 J3.A3 J3.A5 J3.A6 J3.A7 J3.A8 J3.A9 J3.B2 J3.B3 J3.B5 J3.B6 J3.B7 J3.B8 J3.B9 J3.M J26.0 J40.0 MK1.4 MK2.4 SW3.1 SW3.None SW3.S U1.A2 U1.A3 U1.A4 U1.A8 U1.A9 U1.A10 U1.A11 U1.A12 U1.A14 U1.A15 U1.B1 U1.B4 U1.B5 U1.B7 U1.B9 U1.B10 U1.B11 U1.B12 U1.B13 U1.B14 U1.B16 U1.C1 U1.C2 U1.C4 U1.C5 U1.C7 U1.C8 U1.C9 U1.C10 U1.C11 U1.C12 U1.C15 U1.D1 U1.D2 U1.D3 U1.D6 U1.D7 U1.D8 U1.D9 U1.D10 U1.D11 U1.D14 U1.E1 U1.E3 U1.E6 U1.E7 U1.E8 U1.E9 U1.E10 U1.E11 U1.E14 U1.F2 U1.F3 U1.F4 U1.F5 U1.F7 U1.F8 U1.F9 U1.F10 U1.F12 U1.F13 U1.F14 U1.G1 U1.G2 U1.G3 U1.G4 U1.G5 U1.G6 U1.G11 U1.G12 U1.G13 U1.G14 U1.H1 U1.H2 U1.H3 U1.H4 U1.H5 U1.H6 U1.H11 U1.H12 U1.H13 U1.H14 U1.J1 U1.J2 U1.J3 U1.J4 U1.J5 U1.J6 U1.J11 U1.J12 U1.J13 U1.J14 U1.K1 U1.K2 U1.K3 U1.K4 U1.K5 U1.K6 U1.K11 U1.K12 U1.K13 U1.K14 U1.L3 U1.L4 U1.L5 U1.L7 U1.L8 U1.L9 U1.L10 U1.L12 U1.L13 U1.L14 U1.L15 U1.L16 U1.M3 U1.M6 U1.M7 U1.M8 U1.M9 U1.M10 U1.M11 U1.M14 U1.M15 U1.M16 U1.N1 U1.N2 U1.N3 U1.N6 U1.N7 U1.N8 U1.N9 U1.N10 U1.N11 U1.N14 U1.N15 U1.N16 U1.P1 U1.P2 U1.P4 U1.P5 U1.P6 U1.P7 U1.P8 U1.P9 U1.P10 U1.P11 U1.P12 U1.P15 U1.P16 U1.R1 U1.R7 U1.R16 U2.1 U2.3 U2.5 U2.6 U4.2 U4.3 U4.4 U4.9 U4.10 U4.11 U6.4 U8.4 U14.2 U14.6 U14.8 U14.11

## Polygon pours and split planes (outlines as drawn)
+3V3_A on Signal Layer 2 "Signal Layer 2-+3V3_A" (solid, pour order 78): 19.575,-28.9 22.24,-31.565 22.24,-37.56 21.19,-38.61 11.397,-38.61 10.25,-37.463 10.25,-32.75 14.1,-28.9
+3V7 on Signal Layer 2 "+3V7_L03_P059" (solid, pour order 59): 0,-22.911 11.895,-22.911 14.05,-20.757 14.05,-19.59 6.902,-12.442 6.902,-9.443 9.008,-9.443 9.17,-9.376 13.893,-4.653 13.96,-4.491 13.96,0 60,0 60,-7.7 25.5,-7.7 18.235,-14.965 18.235,-28.693 13.988,-28.693 10,-32.681 10,-37.4 11.427,-38.827 22.373,-38.827 22.8,-38.4 49.3,-38.4 49.3,-32.8 60,-32.8 60,-51.1 0,-51.1
+3V7_BATT on Signal Layer 2 "+3V7_BATT_L03_P068" (solid, pour order 68): -4.1,-22.6 11.725,-22.6 13.691,-20.634 13.691,-19.659 6.6,-12.568 6.6,-9.1 8.94,-9.1 13.503,-4.537 13.503,0 0,0 0,-12.1 -4.1,-12.1
+3V3_D on Signal Layer 2 "+3V3_D_L03_P072" (solid, pour order 72): 18.711,-15.189 25.9,-8 60,-8 60,-32.6 49.1,-32.6 49.1,-38.2 22.544,-38.2 22.544,-31.566 19.679,-28.7 18.491,-28.7 18.483,-19.357 18.711,-19.129
+3V3_F on Solder Side "+3V3_F_L04_P070" (solid, pour order 70): 30,-29.4 35.4,-29.4 36.5,-30.5 36.5,-35.9 35.4,-37 30,-37 28.9,-35.9 28.9,-30.5 30,-29.4 30,-27.6 29.5,-27.6 28.5,-26.6 23.5,-26.6 23.5,-40.1 36,-40.1 37.5,-41.6 45,-41.6 45,-34.8 42.831,-34.8 39.866,-31.723 39.866,-27.6 30,-27.6
GND on Solder Side "GND_L04_P074" (solid, pour order 74): 15.7,-6.9 17.6,-8.8 17.6,-13.8 10.5,-13.8 10.5,-11.2 13,-11.2 13,-6.9
AGND on Signal Layer 1 "Signal Layer 1-AGND" (solid, pour order 58): 6.6,-36.4 14.093,-28.907 19.607,-28.907 22.5,-31.8 22.5,-38.005 24.1,-39.5 24.1,-40.3 22.9,-41.5 21.102,-41.5 20.303,-40.701 16.596,-40.697 15.919,-41.419 15.297,-40.797 6.6,-40.812
GND on Signal Layer 1 "Ground Plane" (solid, pour order 76): 0,-51.1 60,-51.1 60,0 0,0 0,-11.6 -4.2,-11.6 -4.2,-23.1 0,-23.1

## Other copper
Solder Side:
  rectangle net BATT_ID: -3.7,-22.1 0.4,-20.1
  rectangle net GND: -3.7,-19.6 0.4,-17.6
  rectangle net BATT_NTC: -3.7,-17.1 0.4,-15.1
  rectangle net +3V7_BATT: -3.7,-14.6 0.5,-12.6
  rectangle net AGND: 17.2,-35.7 20.4,-32.9

## Silkscreen, mask and mechanical layers (free items; w line width, h text height)
Top Overlay:
  circle w0.203: c21.299,-8.15 r0.183
  lines w0.203: 21.7,-11.5 24.7,-11.5 ; 21.7,-8.1 22.9,-8.1 ccw(c23.2,-8.1) 23.5,-8.1 24.7,-8.1
  text "ADB" at 0.5,-2.1 h1.52
  text "TTY" at 25.9,-4.2 h1.52 r90
  text "CHG" at 14.6,-9 h1.02 r90
  text "ON" at 4.6,-9.9 h1.52
  text "−" at 6.2,-13.2 h1.02 r90
  text "NTC" at 7.7,-13.21 h1.02 r90
  text "I.D" at 9.3,-13.2 h1.02 r90
  text "+" at 10.7,-13.2 h1.02 r90
  text "BOOTUSB" at 27.008,-13.2 h1.02 r90
  text "+" at 2.2,-14.1 h1.02
  text "NTC" at 1.9,-16.6 h1.02
  text "−" at 2.2,-19.1 h1.02
  text "BOOT1" at 39.6,-21.3 h1.02
  text "I.D" at 2.3,-21.6 h1.02
  text "VOL−" at 3.7,-23.5 h1.52 r270
  text "SW_PWR" at 33.1,-24 h1.02
  text "L1" at 44.2,-29 h1.02
  text "L2" at 46,-29 h1.02
  text "M1" at 40.4,-31.1 h1.02 r270
  text "M2" at 42.3,-31.1 h1.02 r270
  text "0" at 50.4,-33.225 h1.02
  text "VOL+" at 3.7,-33.5 h1.52 r270
  text "TCK" at 50.4,-34.625 h1.02
  text "TMS" at 50.4,-36.025 h1.02
  text "TDI" at 50.4,-37.425 h1.02
  text "TDO" at 50.4,-38.825 h1.02
  text "3V3" at 50.4,-40.225 h1.02
Bottom Overlay:
  circle w0.254: c49.1,-11.9 r0.889
  region: 58.9,-13.4 29.9,-13.4 29.9,-19.4 58.9,-19.4
  lines w0.254: 48.814,-12.257 ccw(c49.1,-11.9) 48.814,-11.543
  text "OSP_Carrier V8.0" at 58.7,-7.4 h1.27
  text "openspeechplatform.ucsd.edu" at 58.7,-9.8 h1.27
  text "Copyright   2019 UCSD / THE_Lab" at 58.7,-12.5 h1.27
  text "LOW" at 56.2,-26.4 h1.02
  text "GOOD" at 56.3,-27.875 h1.02
  text "USR3" at 56.3,-29.4 h1.02
  text "MUTE" at 56.3,-30.9 h1.02
  text "WIFI" at 56.3,-32.363 h1.02
  text "BT" at 56.3,-33.9 h1.02
  text "MIC R" at 1.7,-43.4 h1.02 r90
  text "MIC L" at 59.3,-43.4 h1.02 r90
Top Solder:
  rectangle: 33.85,-9.5 34.725,-6.5
  rectangle: 31.35,-8.725 32.225,-7.275
  region: 34.5,-12.5 34.5,-11.1 33.5,-11.1 33.5,-12.5
  region: 32.5,-12.5 32.5,-11.1 31.5,-11.1 31.5,-12.5
  region: 34,-11.1 34,-10.1 32,-10.1 32,-11.1
  region: 34,-13.5 34,-12.5 32,-12.5 32,-13.5
  rectangle: 7.3,-4.6 9.9,-3.2
  rectangle: 18.3,-4.6 20.9,-3.2
  region: 53.9,-15.775 53.7,-15.775 53.7,-17.225 53.9,-17.225
Mechanical 3:
  the board outline again, w0.1

## Text inside footprints (layer, text, board x,y; h text height)
A1: Bottom Overlay "J1" at 33.6,-2.38 h0.51 r180; Bottom Overlay "1" at 43.1,-3.48 h0.51 r180; Bottom Overlay "2" at 43.1,-1.38 h0.51 r180; Bottom Overlay "89" at 24,-3.48 h0.51 r180; Bottom Overlay "90" at 24,-1.38 h0.51 r180; Bottom Overlay "90" at 24,-20.98 h0.51 r180; Bottom Overlay "89" at 24,-23.08 h0.51 r180; Bottom Overlay "2" at 43.1,-20.98 h0.51 r180; Bottom Overlay "1" at 43.1,-23.08 h0.51 r180; Bottom Overlay "J2" at 33.5,-21.98 h0.51 r180
J0: Bottom Overlay "1" at 43.1,-3.48 h0.51 r180; Bottom Overlay "2" at 43.1,-1.38 h0.51 r180; Bottom Overlay "89" at 24,-3.48 h0.51 r180; Bottom Overlay "90" at 24,-1.38 h0.51 r180
J00: Bottom Overlay "1" at 43.1,-23.08 h0.51 r180; Bottom Overlay "2" at 43.1,-20.98 h0.51 r180; Bottom Overlay "89" at 24,-23.08 h0.51 r180; Bottom Overlay "90" at 24,-20.98 h0.51 r180